# Altium PCB DongcoDC.PcbDoc
Units mil, origin at the board's own origin, x right, y up, seen from the top; angles counter-clockwise.
Board outline 6000 x 4000 mil, 2 copper layers (Top Layer, Bottom Layer); 38 components, 31 nets, 99 pads, 0 vias.
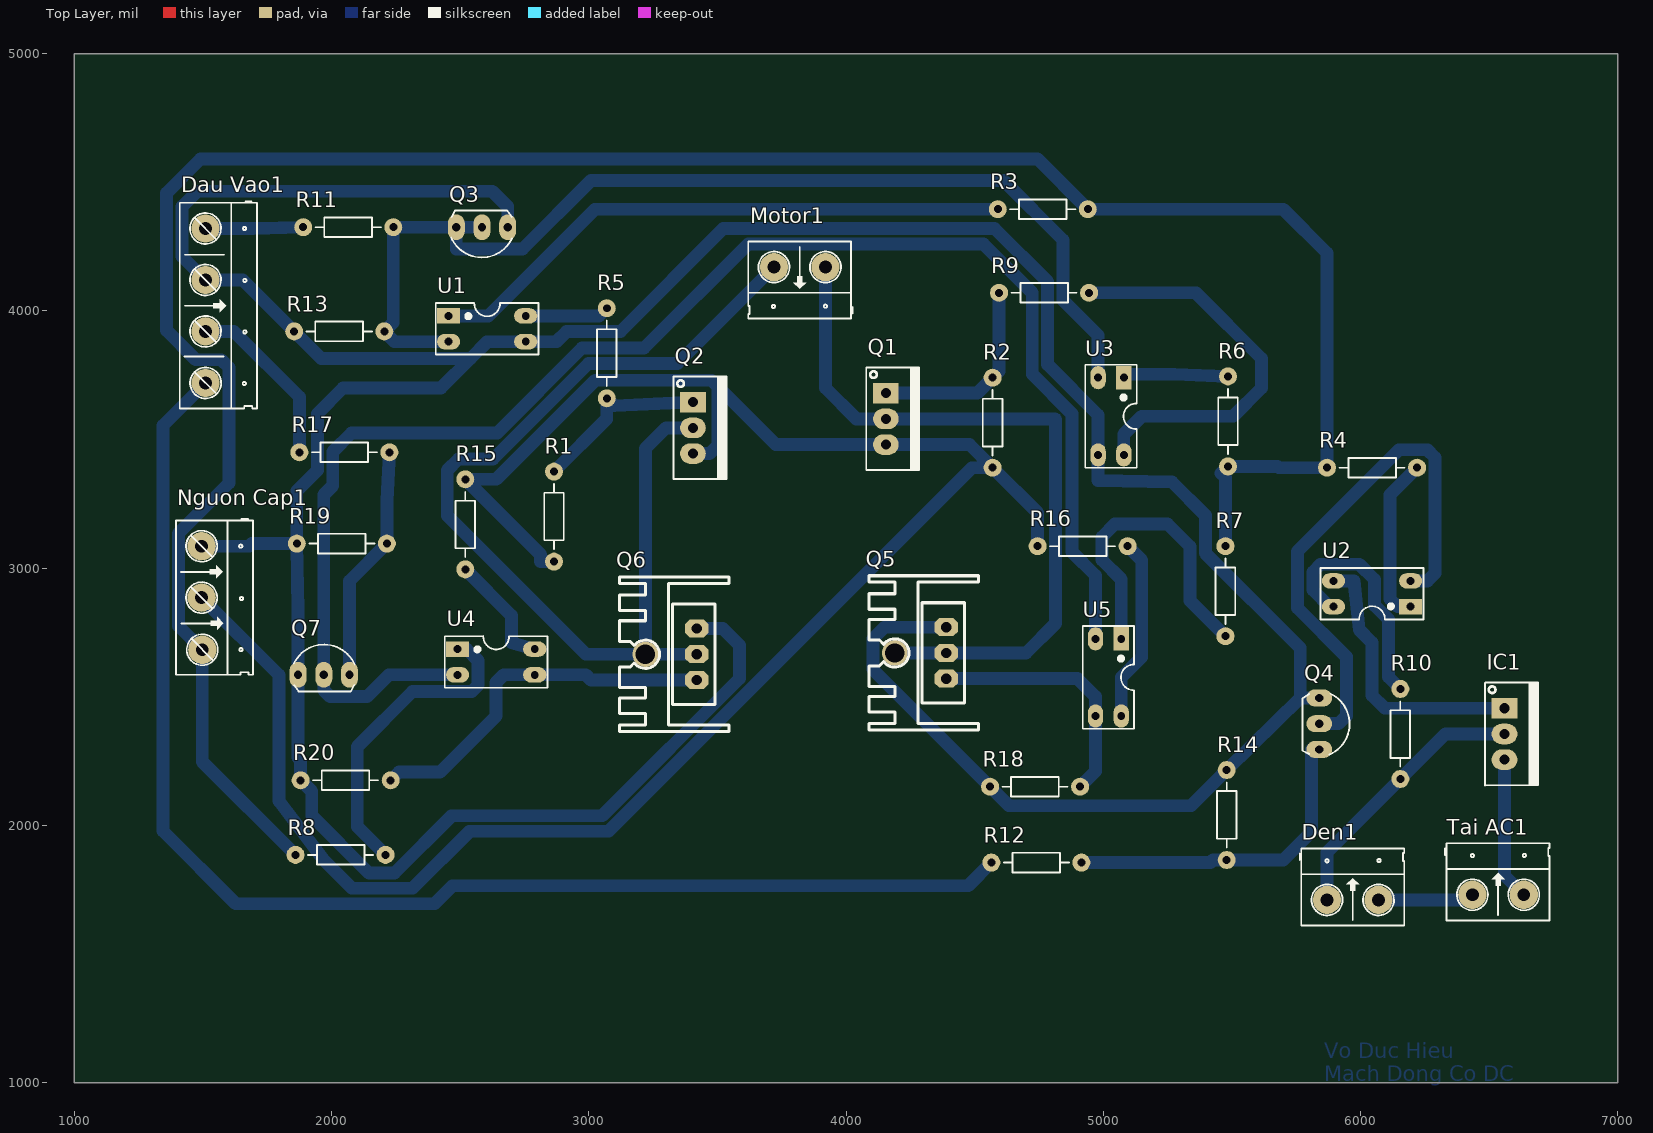
[diagram p0: Top Layer view]
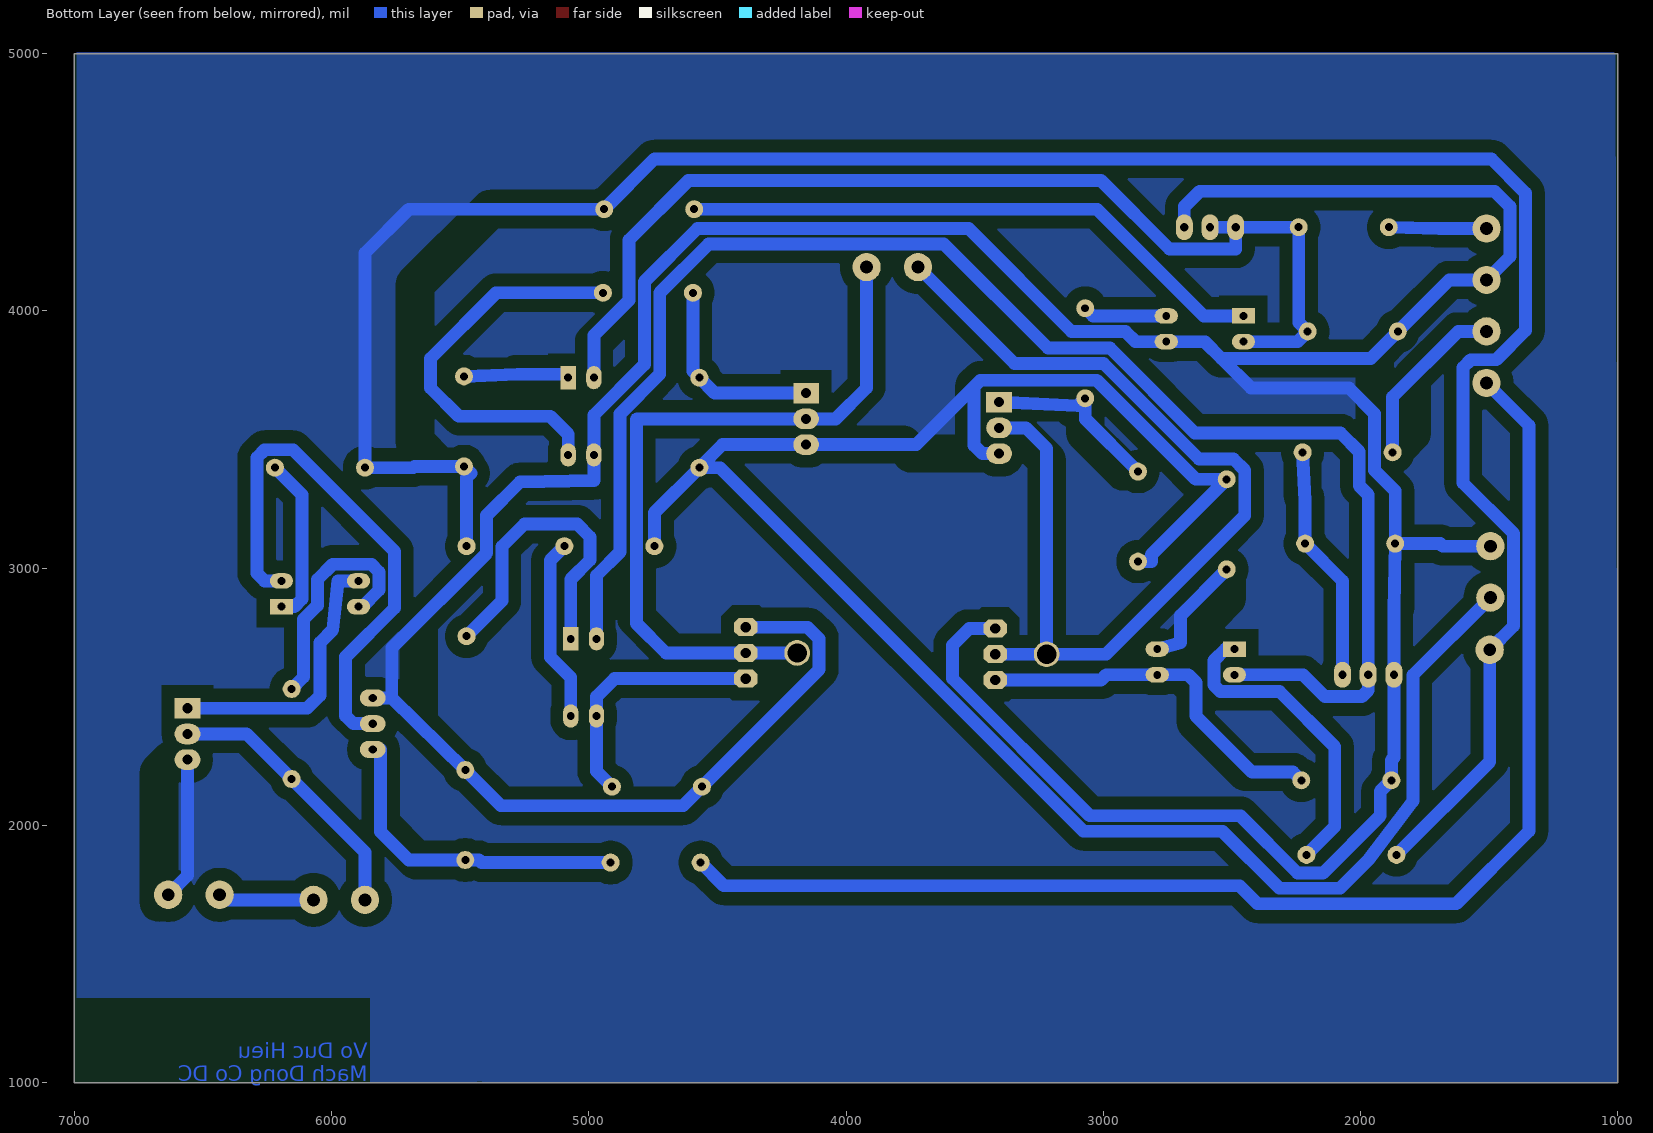
[diagram p1: Bottom Layer view, seen from below]
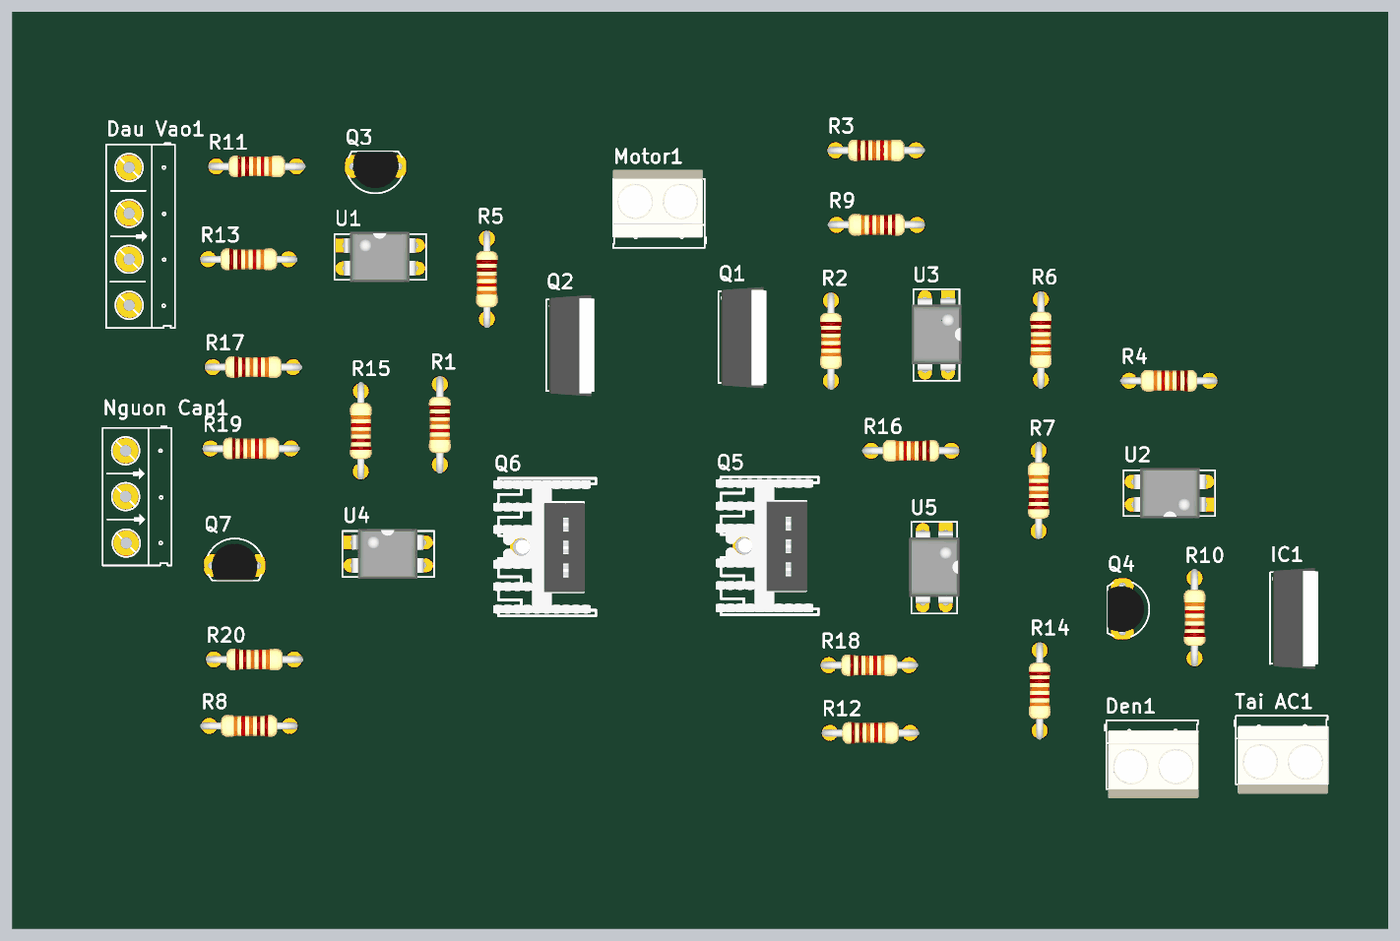
[diagram p2: 3D render of the assembled board from above, using the file's embedded part models]

## Layer stack, top to bottom
Top Solder: solder mask 0.4, Solder Resist, Dk 3.5
Top Layer: signal copper 1.4
Dielectric 1: dielectric 12.6, FR-4, Dk 4.8
Bottom Layer: signal copper 1.4
Bottom Solder: solder mask 0.4, Solder Resist, Dk 3.5

## Board outline
1000,1000 7000,1000 7000,5000 1000,5000

## Design rules (kind name [scope] priority, off if disabled: settings)
Clearance [All] p1: gap=10 ignorepadtopadclearanceinfootprint=FALSE except(0: Arc-Hole Track-Hole SMDPad-Hole THPad-Hole Via-Hole Fill-Hole Poly-Hole Region-Hole Text-Hole; 50: Arc-Fill Arc-Poly Arc-Region Track-Fill Track-Poly Track-Region SMDPad-Fill SMDPad-Poly SMDPad-Region THPad-Fill THPad-Poly THPad-Region Via-Fill Via-Poly Via-Region Fill-Fill Fill-Poly Fill-Region Poly-Poly Poly-Region Region-Region)
PolygonConnect [All] p1: connectstyle=Relief reliefconductorwidth=10 reliefentries=4 polygonreliefangle="90 Angle" airgapwidth=10
RoutingLayers [All] p1: top layer_v5=FALSE bottom layer_v5=TRUE
RoutingVias [All] p1: holewidth=28 width=50 viastyle="Through Hole" minholewidth=28 minwidth=50 maxholewidth=28 maxwidth=50
SolderMaskExpansion [All] p1: expansion=4 istentingtop=FALSE
Width [All] p1: maxlimit=50 minlimit=10 preferedwidth=50 toplayer_maxwidth=10 toplayer_prefwidth=10 bottomlayer_minwidth=40 minimp=50.000000 maximp=50.000000 favimp=50.000000
29 further rules are at their usual default settings.

## Components (designator, comment, footprint, x,y, rotation, side; value= is the part's Value field where it differs from the comment)
"Dau Vao1" "Header 4" HED4 1509.94,4320.06 r270 top
Den1 "Header 2" HED2 5870,1710 r0 top
IC1 "BT137" QTO-220 6560,2455 r270 top value=LM317
Motor1 "Header 2" HED2 3920,4170 r180 top
"Nguon Cap1" "Header 3" HED3 1495,3085 r270 top
Q1 "IRF9540" QTO-220 4155,3680 r270 top
Q2 "IRF9540" QTO-220 3405,3645 r270 top
Q3 "C1815" QTO-92 2585,4325 r180 top
Q4 "C1815" QTO-92 5840,2395 r270 top
Q5 "IRFZ44" QTO-220H3 4390,2570 r90 top
Q6 "IRFZ44" QTO-220H3 3420,2565 r90 top
Q7 "C1815" QTO-92 1970,2585 r0 top
R1 "Res1" R1/4W 2865,3025 r90 top value=10k
R2 "Res1" R1/4W 4570,3390 r90 top value=10k
R3 "Res1" R1/4W 4940,4395 r180 top value=560
R4 "Res1" R1/4W 5870,3390 r0 top value=150
R5 "Res1" R1/4W 3070,3660 r90 top value=6k8
R6 "Res1" R1/4W 5485,3395 r90 top value=560
R7 "Res1" R1/4W 5475,3085 r270 top value=560
R8 "Res1" R1/4W 1860,1885 r0 top value=560
R9 "Res1" R1/4W 4595,4070 r0 top value=5k6
R10 "Res1" R1/4W 6155,2530 r270 top value=68
R11 "Res1" R1/4W 2240,4325 r180 top value=330
R12 "Res1" R1/4W 4915,1855 r180 top value=330
R13 "Res1" R1/4W 2205,3920 r180 top value=2k7
R14 "Res1" R1/4W 5480,1865 r90 top value=1K
R15 "Res1" R1/4W 2520,3345 r270 top value=6k8
R16 "Res1" R1/4W 4745,3085 r0 top value=5k6
R17 "Res1" R1/4W 2225,3450 r180 top value=330
R18 "Res1" R1/4W 4910,2150 r180 top value=10k
R19 "Res1" R1/4W 2215,3095 r180 top value=2k7
R20 "Res1" R1/4W 2230,2175 r180 top value=10k
"Tai AC1" "Header 2" HED2 6435,1730 r0 top
U1 "PC817" DIP4/W0.3 2455,3980 r270 top
U2 "PC817" DIP4/W0.3 6195,2850 r90 top
U3 "PC817" DIP4/W0.3 5080,3740 r180 top
U4 "PC817" DIP4/W0.3 2490,2685 r270 top
U5 "PC817" DIP4/W0.3 5070,2725 r180 top

## Footprints (in the part's own frame and the unit in brackets; to place one, negate y for a bottom-side part, rotate by r counter-clockwise, add the part's x,y. Pads: shape width x height; smd on the part's side, far side on the other; paste and mask are expansions set on the pad)
DIP4/W0.3 [mil] "4 PIN, W 300mil, Pin to pin 100mil"
  rect 60x90 hole 31: 1(0,0)
  oval 60x90 hole 31: 2(100,0) 3(100,300) 4(0,300)
  silkscreen extent -50,-50 150,350, body extent -59,-10 159,305, height 170
HED2 [mil] "Header 2, 2 pin, hight 300mil, Pin to Pin 200, Colour Green"
  round 110 hole 50: 1(0,0) 2(200,0)
  silkscreen extent -106,-100 300,200, body extent -92,-140 302,155, height 394
HED3 [mil] "Header 3, 3 pin, hight 300mil, Pin to Pin 200, Colour Green"
  round 110 hole 50: 1(0,0) 2(200,0) 3(402.62,2.62)
  silkscreen extent -106,-100 500,200
HED4 [mil] "Header 4, 4 pin, hight 300mil, Pin to Pin 200, Colour Green"
  round 110 hole 50: 1(0,0) 2(200,0) 3(400.06,0.06) 4(600.39,0.39)
  silkscreen extent -106,-100 700,200
QTO-92 [mil] "TO-92"
  oval 66x100 hole 32: 1(-100,0) 2(0,0) 3(100,0)
  silkscreen extent -117,-65 120,118, body extent -109,-66 109,95, height 245
QTO-220 [mil] "TO-220 - 1-2-3"
  rect 80x100 hole 39: 1(0,0)
  oval 80x100 hole 39: 2(100,0) 3(200,0)
  silkscreen extent -100,-76 300,130, body extent -119,-64 322,121, height 755
QTO-220H3 [mil] "TO-220 1-2-3"
  oct 70x90 hole 40: 1(0,0) 2(100,0) 3(200,0)
  round 100 hole 75: 2(100,200)
  silkscreen extent -200,-125 400,300, body extent -190,-102 392,323, height 984
R1/4W [mil] "R 1/4W, 2 Pin, 350mil"
  round 70 hole 31: 1(0,0) 2(350,0)
  silkscreen extent 48,-38 302,38, body extent -40,-47 386,47, height 111

## Part data
"Dau Vao1": library part Hed4, "Header 4 (Green)"
Den1 Motor1 "Tai AC1": library part Hed2, "Header 2 (Green)"
IC1: "Triacs - 8A"
"Nguon Cap1": library part Hed3, "Header 3 (Green)"
Q1 Q2: "HEXFET P-Channel Power MOSFET", ComponentLink1Description="Manufacturer Link", ComponentLink1URL=http://www.irf.com/, ComponentLink2Description=Datasheet, ComponentLink2URL=http://www.irf.com/product-info/datasheets/data/irf9540.pdf, DatasheetVersion=PD-9.421C, LatestRevisionDate=17-Jul-2002, LatestRevisionNote="Re-released for DXP Platform.", Note="Pin 2 is electrically connected to pin 4.", PackageDescription="TO, Thru-Hole, Vertical, Heatsink Mounted; 3 In-Line Leads; Pitch 2.54 mm", PackageReference=TO-220AB, PackageVersion=Feb-1997, Published=8-Jun-2000, Publisher="Altium Limited"
Q3 Q4 Q7: "NPN 600mW, ECB"
Q5 Q6: "HEXFET N-Channel Power MOSFET"
R1 R2 R3 R4 R5 R6 R7 R8 R9 R10 R11 R12 R13 R14 R15 R16 R17 R18 R19 R20: library part Res1_1, "Resistor", Manufacturer="Generic Components", Class=Passive, Published=08/06/2000, Publisher="Altium Hobart Technology Centre", SubClass=Resistor
U1 U2 U3 U4 U5: "Single Opto"

## Nets (pads, with @x,y where several pads share a name; then routed paths per layer and width w, separated by ;. In a path a pad name is that pad's centre, name@x,y a point inside that pad or via, vN(x,y) a via of type N, cw(c..) or ccw(c..) an arc to the next point about the centre after c; other vN are vias at no path point)
GND: "Dau Vao1.2" "Nguon Cap1.1" Q3.1 Q4.1 Q5.3 Q6.3 Q7.1 R13.2 R14.2 R18.2 R19.2 R20.2 U1.3 U3.3 | length 15217.6
  Bottom Layer w50: 1495,3085 1680,3085 1690,3095 R19.2 ; Q3.1 2685,4405 2625,4465 1479,4465 1419,4405 1419,4211 1509.94,4120.06 1654.94,4120.06 R13.2 1960,3815 2540,3815 ; Q6.3 3521,2765 3586,2700 3586,2570.85 3052.15,2037 2467,2037 2245,1815 2145,1815 1923,2037 1923,2132 R20.2 1880,2253.02 1870,2263.02 Q7.1 1870,2835 R19.2 ; Q5.3 4150,2770 4105,2725 4105,2605 R18.2 4634,2076 5341,2076 R14.2 5766,2495 ; Q4.1 5766,2495 ; R19.2 1865,3300 1945,3380 1945,3600 2045,3700 2425,3700 2540,3815 ; 2540,3815 2605,3880 U1.3 2874,3880 2914,3920 3123,3920 3523,4320 4577,4320 4784,4113 4784,3791 4980,3595 U3.3 4980,3340 5267,3335 5397,3205 5397,3058 5766,2689 5766,2495
"NetDau Vao1_1": "Dau Vao1.1" R11.2 | length 380.1
  Bottom Layer w50: 1509.94,4320.06 1695.06,4320.06 R11.2
"NetDau Vao1_3": "Dau Vao1.3" R17.2 | length 685.6
  Bottom Layer w50: 1510,3920 1620,3920 1875,3665 R17.2
"NetDau Vao1_4": "Dau Vao1.4" R12.2 | length 5213.6
  Bottom Layer w50: 1510.33,3719.67 1345,3554.34 1345,1978 1628,1695 2400,1695 2470,1765 4475,1765 R12.2
NetDen1_1: Den1.1 IC1.2 R10.2 | length 1065.5
  Bottom Layer w50: Den1.1 5870,1895 R10.2 6330,2355 IC1.2
NetDen1_2: "Tai AC1.1" Den1.2 | length 373.3
  Bottom Layer w50: Den1.2 6415,1710 6435,1730
NetIC1_1: IC1.1 U2.3 | length 1082.5
  Bottom Layer w50: U2.3 5975,2950 5995,2760 6045.04,2709.96 6045.04,2504.96 6095,2455 IC1.1
NetIC1_3: "Tai AC1.2" IC1.3 | length 556.1
  Bottom Layer w50: IC1.3 6560,1805 6635,1730
NetMotor1_1: Motor1.1 Q1.2 Q5.2 | length 2881.2
  Bottom Layer w50: Motor1.1 3920,3700 4040,3580 Q1.2 4813,3580 4815,3578 4815,2785 4700,2670 4390,2670 Q5.2@4190,2670
NetMotor1_2: Motor1.2 Q2.2 Q6.2 | length 3984.6
  Bottom Layer w50: Q2.2 3300,3545 3220,3465 Q6.2@3220,2665 ; Q6.2@3420,2665 Q6.2@3220,2665 ; Motor1.2 3345,3795 2999,3795 2628,3424 2494,3424 2450,3380 2450,3204 2989,2665 Q6.2@3220,2665
"NetNguon Cap1_2": "Nguon Cap1.2" Q1.3 Q2.3 R1.1 R2.1 R15.1 R16.1 | length 8085.5
  Bottom Layer w50: 1495,2885 1796,2584 1796,2094.15 1969.1,1865.9 2080,1755 2315,1755 2537,1977 3077,1977 4490,3390 R2.1 ; R1.1 2813,3025 2813,3052 R15.1 2640,3345 3025,3730 3477,3730 3502,3705 ; Q2.3 3470,3445 3502,3477 3502,3705 ; R16.1 4745,3215 R2.1 ; 3502,3705 3727,3480 Q1.3 4480,3480 R2.1
"NetNguon Cap1_3": "Nguon Cap1.3" R3.1 R4.1 R6.1 R7.1 R8.1 | length 9267.6
  Bottom Layer w50: R8.1 1497.62,2247.38 1497.62,2682.38 1405,2775 1405,3135 1601,3331 1601,3780 1571,3810 1472,3810 1359,3923 1359,4458 1491,4590 4745,4590 R3.1 5700,4395 5870,4225 R4.1 5683,3390 5678,3395 R6.1 5458.5,3368.5 5475,3352 R7.1
NetQ1_1: Q1.1 R2.2 R9.1 | length 780.2
  Bottom Layer w50: Q1.1 4510,3680 R2.2 4595,3765 R9.1
NetQ2_1: Q2.1 R1.2 R5.1 | length 717.2
  Bottom Layer w50: R1.2 3070,3580 R5.1 3099,3631 Q2.1
NetQ3_2: Q3.2 Q3.3 R11.1 R13.1 U1.2 U3.2 | length 4272.3
  Bottom Layer w50: U1.2 2245,3880 R13.1 2240,3955 R11.1 Q3.3 ; Q3.2 Q3.3 ; U3.2 4980,3905 4844,4041 4844,4275 4613,4506 3008,4506 2742,4240 2485,4240 Q3.3
NetQ4_2: Q4.2 U2.2 | length 2104.6
  Bottom Layer w50: Q4.2 5915,2395 5945,2425 5945,2655 5755,2845 5755,3065 6150,3460 6260,3460 6290,3430 6290,2980 6260,2950 U2.2
NetQ4_3: Q4.3 R12.1 R14.1 | length 1294.7
  Bottom Layer w50: R12.1 5417,1855 5427,1865 R14.1 5700,1865 5810,1975 5810,2295 Q4.3
NetQ5_1: Q5.1 R18.1 U5.3 | length 983.8
  Bottom Layer w50: Q5.1 4900,2570 4970,2500 U5.3 4970,2210 R18.1
NetQ6_1: Q6.1 R20.1 U4.3 | length 1444.7
  Bottom Layer w50: R20.1 2262.26,2207.26 2422.26,2207.26 2640,2425 2640,2555.71 2669.29,2585 U4.3 2988,2585 3008,2565 Q6.1
NetQ7_2: Q7.2 U4.2 U5.2 | length 6086.3
  Bottom Layer w50: U4.2 2223,2585 2138,2500 1995,2500 1970,2525 Q7.2 1970,3285 2005,3320 2005,3452 2078,3525 2644.15,3525 2974.15,3855 3215,3855 3620,4260 4534,4260 4724,4070 4724,3754 4878,3600 4878,3063 4970,2971 U5.2
NetQ7_3: Q7.3 R17.1 R19.1 | length 925.3
  Bottom Layer w50: Q7.3 2070,2950 R19.1 2215,3262 R17.1
NetR3_2: R3.2 U1.1 | length 2306.9
  Bottom Layer w50: U1.1 2609,3980 3024,4395 R3.2
NetR4_2: R4.2 U2.1 | length 645.9
  Bottom Layer w50: U2.1 6145,2850 6115,2880 6115,3285 R4.2
NetR5_2: R5.2 U1.4 | length 327.4
  Bottom Layer w50: U1.4 3040,3980 R5.2
NetR6_2: R6.2 U3.1 | length 418.7
  Bottom Layer w50: U3.1 5080,3753.52 5274.48,3753.52 R6.2
NetR7_2: R7.2 U5.1 | length 1231.5
  Bottom Layer w50: U5.1 5070,2956 4995,3031 4995,3120.8 5045,3170.8 5249.88,3170.8 5336.96,3083.73 5336.96,2873.04 R7.2
NetR8_2: R8.2 U4.1 | length 1228.6
  Bottom Layer w50: R8.2 2100,1995 2100,2305 2315,2520 2545,2520 2570,2545 2570,2640 2525,2685 U4.1
NetR9_2: R9.2 U3.4 | length 1580.2
  Bottom Layer w50: R9.2 5360,4070 5615,3815 5615,3700 5505,3590 5150,3590 5080,3520 U3.4
NetR10_1: R10.1 U2.4 | length 920.6
  Bottom Layer w50: U2.4 5880,2850 5815,2915 5815,2985 5845,3015 5995,3015 6055,2955 6055,2855 6109,2801 6109,2576 R10.1
NetR15_2: R15.2 U4.4 | length 453
  Bottom Layer w50: R15.2 2700,2815 2700,2710 U4.4
NetR16_2: R16.2 U5.4 | length 715.5
  Bottom Layer w50: U5.4 5070,2575 5149.5,2654.5 5149.5,3030.5 R16.2

## Polygon pours and split planes (outlines as drawn)
no net on Bottom Layer "NONET_L02_P000" (solid, pour order 0): 1010,5000 1015,5005 6990,5005 6990,1020 7000,1010 6990,1000 1000,1000

## Other copper
Bottom Layer:
  text "Vo Duc Hieu / Mach Dong Co DC" at 5860,1005 h60